# Altium PCB ELO301_G1.PcbDoc (part 2 of 2)
Units mil, origin at the board's own origin, x right, y up, seen from the top; angles counter-clockwise.
Board outline 2755.91 x 1968.5 mil, 4 copper layers (Top Layer, GND, Senal-Potencia, Bottom Layer), stack 62.449 mil thick; 70 components, 51 nets, 256 pads, 183 vias.
Unrouted connection lines stored in the file: 32.
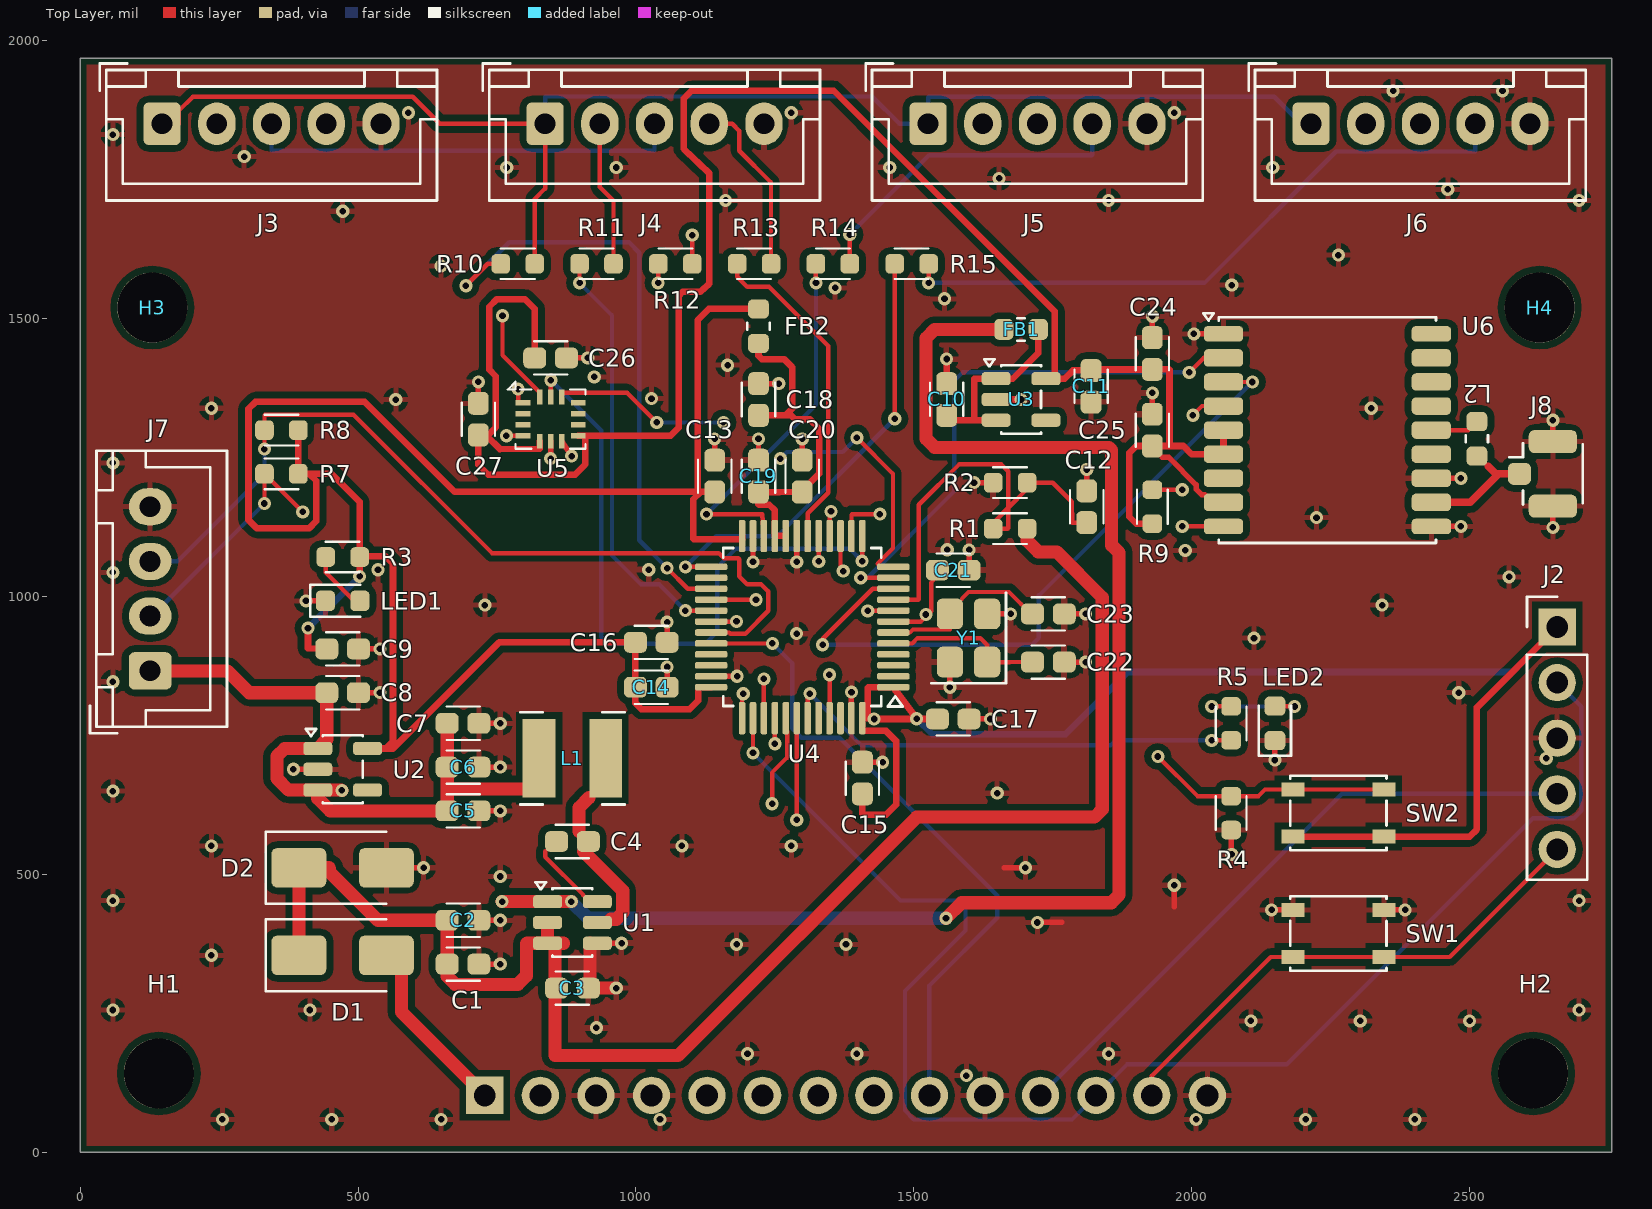
[diagram p0: Top Layer view]

## Via types
v1: diameter 23.62, hole 11.81, Top Layer to Bottom Layer, tented both sides, 183 vias

## Nets (pads, with @x,y where several pads share a name; then routed paths per layer and width w, separated by ;. In a path a pad name is that pad's centre, name@x,y a point inside that pad or via, vN(x,y) a via of type N, cw(c..) or ccw(c..) an arc to the next point about the centre after c; other vN are vias at no path point) (continued)
V_5V: C5.1 C6.1 C7.1 C8.1 FB1.1 J7.1 L1.2 U1.1 U2.1 U2.3 | length 4211.7
  Top Layer w23.62: J7.1 265,866.1 304.3,826.8 C8.1 443.86,742.64 U2.1 367.9,726.4 354,712.5 354,672.6 375,651.6 U2.3 ; v1(471,651) 470.4,651.6 U2.3 ; C7.1 C6.1 C5.1 450,614.2 427.62,636.58 U2.3 ; 671.26,653.54 795.28,653.54 ; v1(759.2,450.8) U1.1 883.8,450.8 v1(884,451) ; v1@1557.87,420.87 1585.83,448.82 1855.51,448.82 1868.9,462.6 1868.9,1079.13 1855.91,1092.13 1855.91,1262.99 1851.18,1268.11 1537.4,1268.11 1522.05,1283.46 1522.05,1464.96 1537.4,1480.32 FB1.1@1661.81,1480.32
  Senal-Potencia w23.62: v1(471,651) 559,651 v1(759.2,450.8)
  Bottom Layer w23.62: v1(884,451) 914,421 v1(1557.9,421)
VDDA: C18.1 C19.1 C20.1 FB2.1 U4.20 U4.21 | length 629.3
  Top Layer w11.81: C19.1 C19.1@1220.5,1187 ; C18.1 1269.26,1325.76 ; FB2.1 1220.5,1433 1226.5,1427 1266.5,1427 1281,1412.5 1281,1337.5 1269.26,1325.76 ; U4.20 U4.21 1249.99,1155 1239.99,1165 1221.5,1165 1220.5,1166 C19.1@1220.5,1187 ; C19.1@1220.51,1187 C20.1 1299.2,1190.2 1330,1221 1330,1301.5 1312.5,1319 1285.76,1319 1279,1325.76 1269.26,1325.76
VIN_12V: D1.2 J1.1 J1.2 | length 440.9
  Top Layer w23.62: D1.2 578,354.3 578,252.4 J1.1
  Senal-Potencia w23.62: J1.1 J1.2
VIN_PROT: C1.1 C2.1 C3.1 D1.1 D2.1 R1.2 U1.2 U1.3 | length 2836.1
  Top Layer w23.62: D1.1 D2.1 448,511.8 449,510.8 449,504 535.7,417.3 C2.1 C1.1 660.46,316.54 675,302 787.5,302 803,317.5 803,375 804,376 U1.3 ; U1.2 U1.3 ; U1.3@854.33,375.98 854.33,295.28 854.33,174.02 911.42,174.02 ; 870,376 U1.3 ; 911.5,174 1076,174 1505,603 1825,603 1839,617 1839,998 1757,1080 1723.71,1080 1703.71,1100 R1.2
VIN_SENSE: C12.1 R1.1 R2.2 U4.9 | length 808.5
  Top Layer w7.87: U4.9 1508,994.11 1509,995.11 1509,1165 1582,1238 1657,1238 1670,1225 1670,1159.31 ; C12.1 1785.43,1132.86 1784.29,1170.41 1750,1204.7 R2.2 1703.71,1193.02 1670,1159.31 ; 1670,1159.31 1670,1123 1669,1122 R1.1 1642.69,1132 1670,1159.31
pads on no net: H1. H2. H3. H4. U2.4 U3.4 U4.2 U4.3 U4.4 U4.26 U4.33 U4.34 U4.44 U4.46 U5.2 U5.3 U5.9 U5.10 U5.11 U6.7 U6.13 U6.15 U6.16 U6.17 U6.18

## Polygon pours and split planes (outlines as drawn)
GND on Bottom Layer "GND_Bottom" (solid, remove dead copper, pour order 1): 11.81,11.81 2744.09,11.81 2744.09,1956.69 11.81,1956.69
GND on Senal-Potencia "GND_Senal" (solid, remove dead copper, pour order 2): 11.81,11.81 2744.09,11.81 2744.09,1956.69 11.81,1956.69
GND on Top Layer "GND_Top" (solid, remove dead copper, pour order 0): 11.81,11.81 2744.09,11.81 2744.09,1956.69 11.81,1956.69
GND on GND (split plane): 2735.81,20.1 20.1,20.1 20.1,1948.41 2735.81,1948.41

## Silkscreen, mask and mechanical layers (free items; w line width, h text height)
Bottom Overlay:
  text "ELO301 G1  v1.1  2026-11" at 1817.44,320.87 h39.37